# Allegro board circuitotx.brd
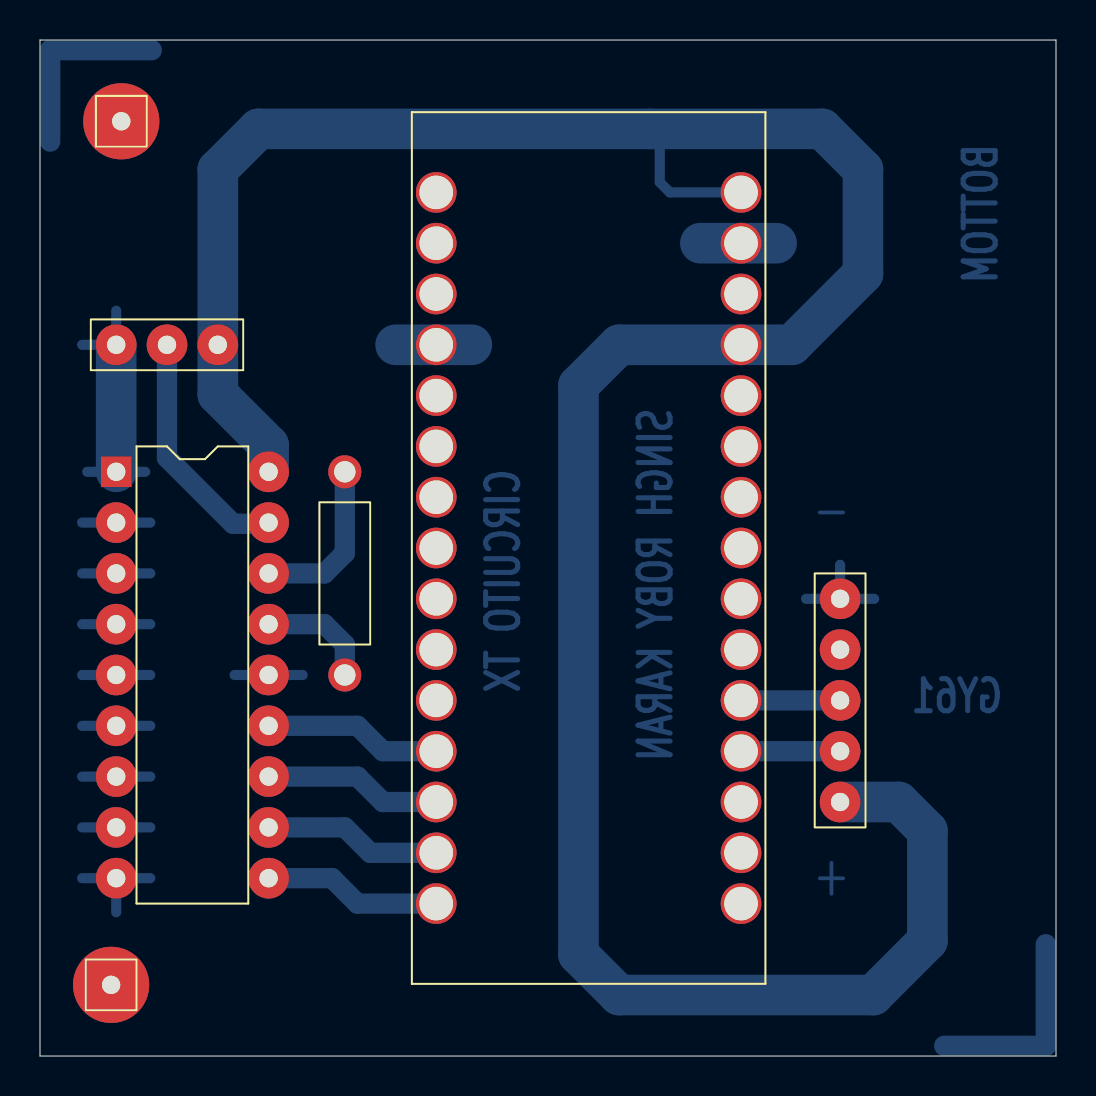
[diagram p0: board, top side]
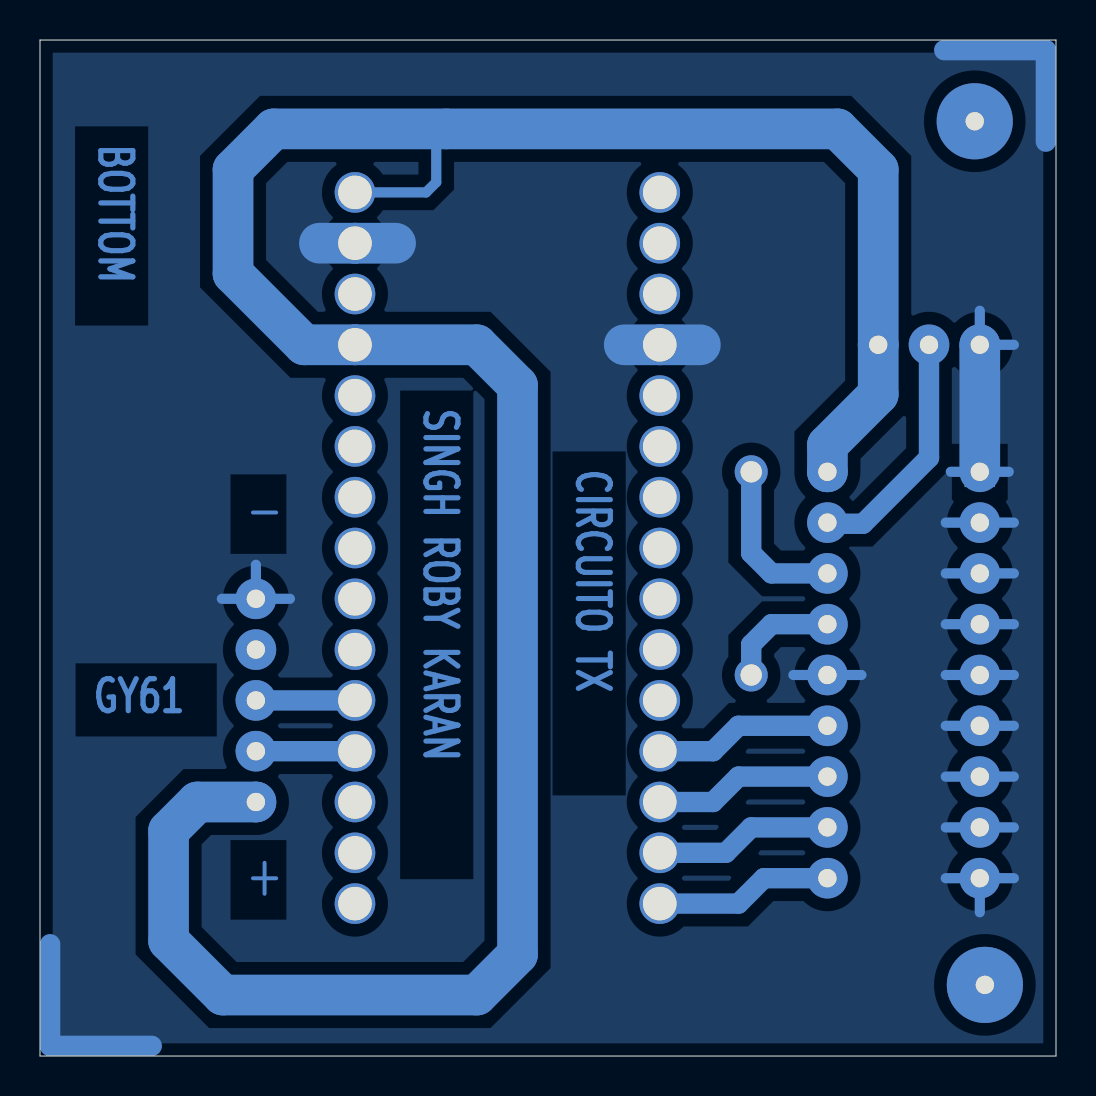
[diagram p1: board, bottom side, seen from below]

Outline 50.8 x 50.8 mm; copper layers: TOP, BOTTOM. Coordinates in mm from the lower left corner of the outline.
Outline path: 0,50.8 50.8,50.8 50.8,0 0,0 0,50.8

## Placement (name value [footprint] x y rotation side)
J3  ARDUINO NANO  [ARDUINO_NANO]  27.43 25.4 0 top
J4  GY-61  [JUMPER5]  40 12.7 90 top
J6  HT12E  [DIP18_3]  3.81 29.21 0 top
J7  CON1  [JUMPER1]  4.06 46.74 0 top
J8  CON1  [JUMPER1]  3.56 3.56 0 top
J9  RF_TX  [JUMPER3]  3.81 35.56 0 top
R1  750k  [RES400]  15.24 29.21 180 top

## Library data of the parts
J3 = CONNECTOR EDGE 15x2_5
J4 = CON5_7: User Part Number: ***
J6 = CON18A_2: Tolerance: ***; User Part Number: ***
J7 J8 = CON1: User Part Number: ***
J9 = CON3: User Part Number: ***
R1 = R: Tolerance: ***; User Part Number: ***

## Footprints (pads in the part's own frame, mm; a bottom-side part is the same pattern mirrored in y, then rotated)
ARDUINO_NANO
  round 2.032 hole 1.676: 1(-7.62,17.78) 2(-7.62,15.24) 3(-7.62,12.7) 4(-7.62,10.16) 5(-7.62,7.62) 6(-7.62,5.08) 7(-7.62,2.54) 8(-7.62,0) 9(-7.62,-2.54) 10(-7.62,-5.08) 11(-7.62,-7.62) 12(-7.62,-10.16) 13(-7.62,-12.7) 14(-7.62,-15.24) 15(-7.62,-17.78) 16(7.62,-17.78) 17(7.62,-15.24) 18(7.62,-12.7) 19(7.62,-10.16) 20(7.62,-7.62) 21(7.62,-5.08) 22(7.62,-2.54) 23(7.62,0) 24(7.62,2.54) 25(7.62,5.08) 26(7.62,7.62) 27(7.62,10.16) 28(7.62,12.7) 29(7.62,15.24) 30(7.62,17.78)
DIP18_3
  rect 1.524x1.524 hole 0.914: 1(0,0)
  round 2.032 hole 0.914: 2(0,-2.54) 3(0,-5.08) 4(0,-7.62) 5(0,-10.16) 6(0,-12.7) 7(0,-15.24) 8(0,-17.78) 9(0,-20.32) 10(7.62,-20.32) 11(7.62,-17.78) 12(7.62,-15.24) 13(7.62,-12.7) 14(7.62,-10.16) 15(7.62,-7.62) 16(7.62,-5.08) 17(7.62,-2.54) 18(7.62,0)
JUMPER1
  round 3.81 hole 0.914: 1(0,0)
JUMPER3
  round 2.032 hole 0.914: 1(0,0) 2(2.54,0) 3(5.08,0)
JUMPER5
  round 2.032 hole 0.914: 1(0,0) 2(2.54,0) 3(5.08,0) 4(7.62,0) 5(10.16,0)
RES400
  round 1.651 hole 1.067: 1(0,0) 2(0,10.16)

## Nets
3.3V: J3.17(3.3V)
GND: J3.4(GND#4) J3.29(GND#29) J4.5(GND) J6.1(A0) J6.2(A1) J6.3(A2) J6.4(A3) J6.5(A4) J6.6(A5) J6.7(A6) J6.8(A7) J6.9(GND) J6.14(TE) J9.1
VCC: J3.27(5V) J3.30(VCC) J4.1(VCC) J6.18(VCC) J9.3
N02522: J3.15(D12) J6.10(AD8)
N02526: J3.14(D11) J6.11(AD9)
N02530: J3.13(D10) J6.12(AD10)
N02534: J3.12(D9) J6.13(AD11)
N02722: J6.15(OSC2) R1.2
N02726: J6.16(OSC1) R1.1
N02860: J6.17(DOUT) J9.2
N03892: J3.19(A0) J4.2(X)
N03899: J3.20(A1) J4.3(Y)

Pads without a net: J3 1 2 3 5 6 7 8 9 10 11 16 18 21 22 23 24 25 26 28; J4 4; J7 1; J8 1

## Routing (per net, layer and track width the routed paths; a pad name or vN(x,y) marks a point on that pad's centre or on a via; arc(x,y) is an arc through that point)
GND: length 77.5
  BOTTOM w0.508: 5.51,19.05 J6.5 2.11,19.05 ; 5.26,29.21 J6.1 2.36,29.21 ; 2.11,8.89 J6.9 ; J6.9 3.81,7.19 ; J6.9 5.51,8.89 ; 2.11,11.43 J6.8 5.51,11.43 ; 2.11,13.97 J6.7 5.51,13.97 ; J4.5 41.71,22.86 ; J4.5 38.3,22.86 ; J4.5 40,24.56 ; 2.11,24.13 J6.3 5.51,24.13 ; 13.13,19.05 J6.14 9.73,19.05 ; 5.51,21.59 J6.4 2.11,21.59 ; 5.51,16.51 J6.6 2.11,16.51 ; 5.51,26.67 J6.2 2.11,26.67 ; 2.11,35.56 J9.1 3.81,37.26
  BOTTOM w1.016: 5.59,50.29 0.51,50.29 0.51,45.72 ; 50.29,5.59 50.29,0.51 45.21,0.51
  BOTTOM w2.032: 33.02,40.64 J3.29 36.83,40.64 ; 21.59,35.56 J3.4 17.78,35.56 ; J6.1 J9.1
VCC: length 137.3
  BOTTOM w0.508: 30.48,46.35 30.99,45.85 30.99,43.69 31.5,43.18 J3.30
  BOTTOM w2.032: J4.1 42.93,12.7 44.37,11.26 44.37,5.76 41.66,3.05 28.96,3.05 26.92,5.08 26.92,33.53 28.96,35.56 J3.27 37.59,35.56 41.15,39.12 41.15,44.32 39.12,46.35 10.92,46.35 8.89,44.32 J9.3 8.89,33.08 11.43,30.54 J6.18
N02522: length 8.8
  BOTTOM w1.016: J6.10 14.6,8.89 15.87,7.62 19.68,7.62
N02526: length 8.8
  BOTTOM w1.016: J6.11 15.24,11.43 16.51,10.16 19.68,10.16
N02530: length 8.8
  BOTTOM w1.016: J6.12 15.87,13.97 17.14,12.7 19.68,12.7
N02534: length 8.8
  BOTTOM w1.016: J6.13 15.87,16.51 17.14,15.24 19.68,15.24
N02722: length 5.8
  BOTTOM w1.016: R1.2 15.24,20.57 14.22,21.59 J6.15
N02726: length 8.3
  BOTTOM w1.016: J6.16 14.22,24.13 15.24,25.15 R1.1
N02860: length 12.4
  BOTTOM w1.016: J6.17 11.37,26.61 9.65,26.61 6.35,29.91 J9.2 6.53,35.38
N03892: length 5.1
  BOTTOM w1.016: 34.92,15.24 J3.19 J4.2
N03899: length 5.1
  BOTTOM w1.016: 34.92,17.78 J3.20 J4.3

## Copper pours and planes (outline as drawn; the poured copper is in the pictures)
GND on BOTTOM: 0.63,0.63 0.63,50.16 50.16,50.16 50.16,0.63

## Text on the board
BOTTOM: GY61 | CIRCUITO TX | SINGH ROBY KARAN | BOTTOM | - | +
